# Altium PCB Urukul.PcbDoc (part 8 of 15)
Units mm, origin at the board's own origin, x right, y up, seen from the top; angles counter-clockwise.
Board outline 161.99 x 100 mm, 6 copper layers (L1, L2, L3, L4, P5, L6), stack 1.548 mm thick; 1078 components, 609 nets, 3798 pads, 2552 vias.
Unrouted connection lines stored in the file: 1.
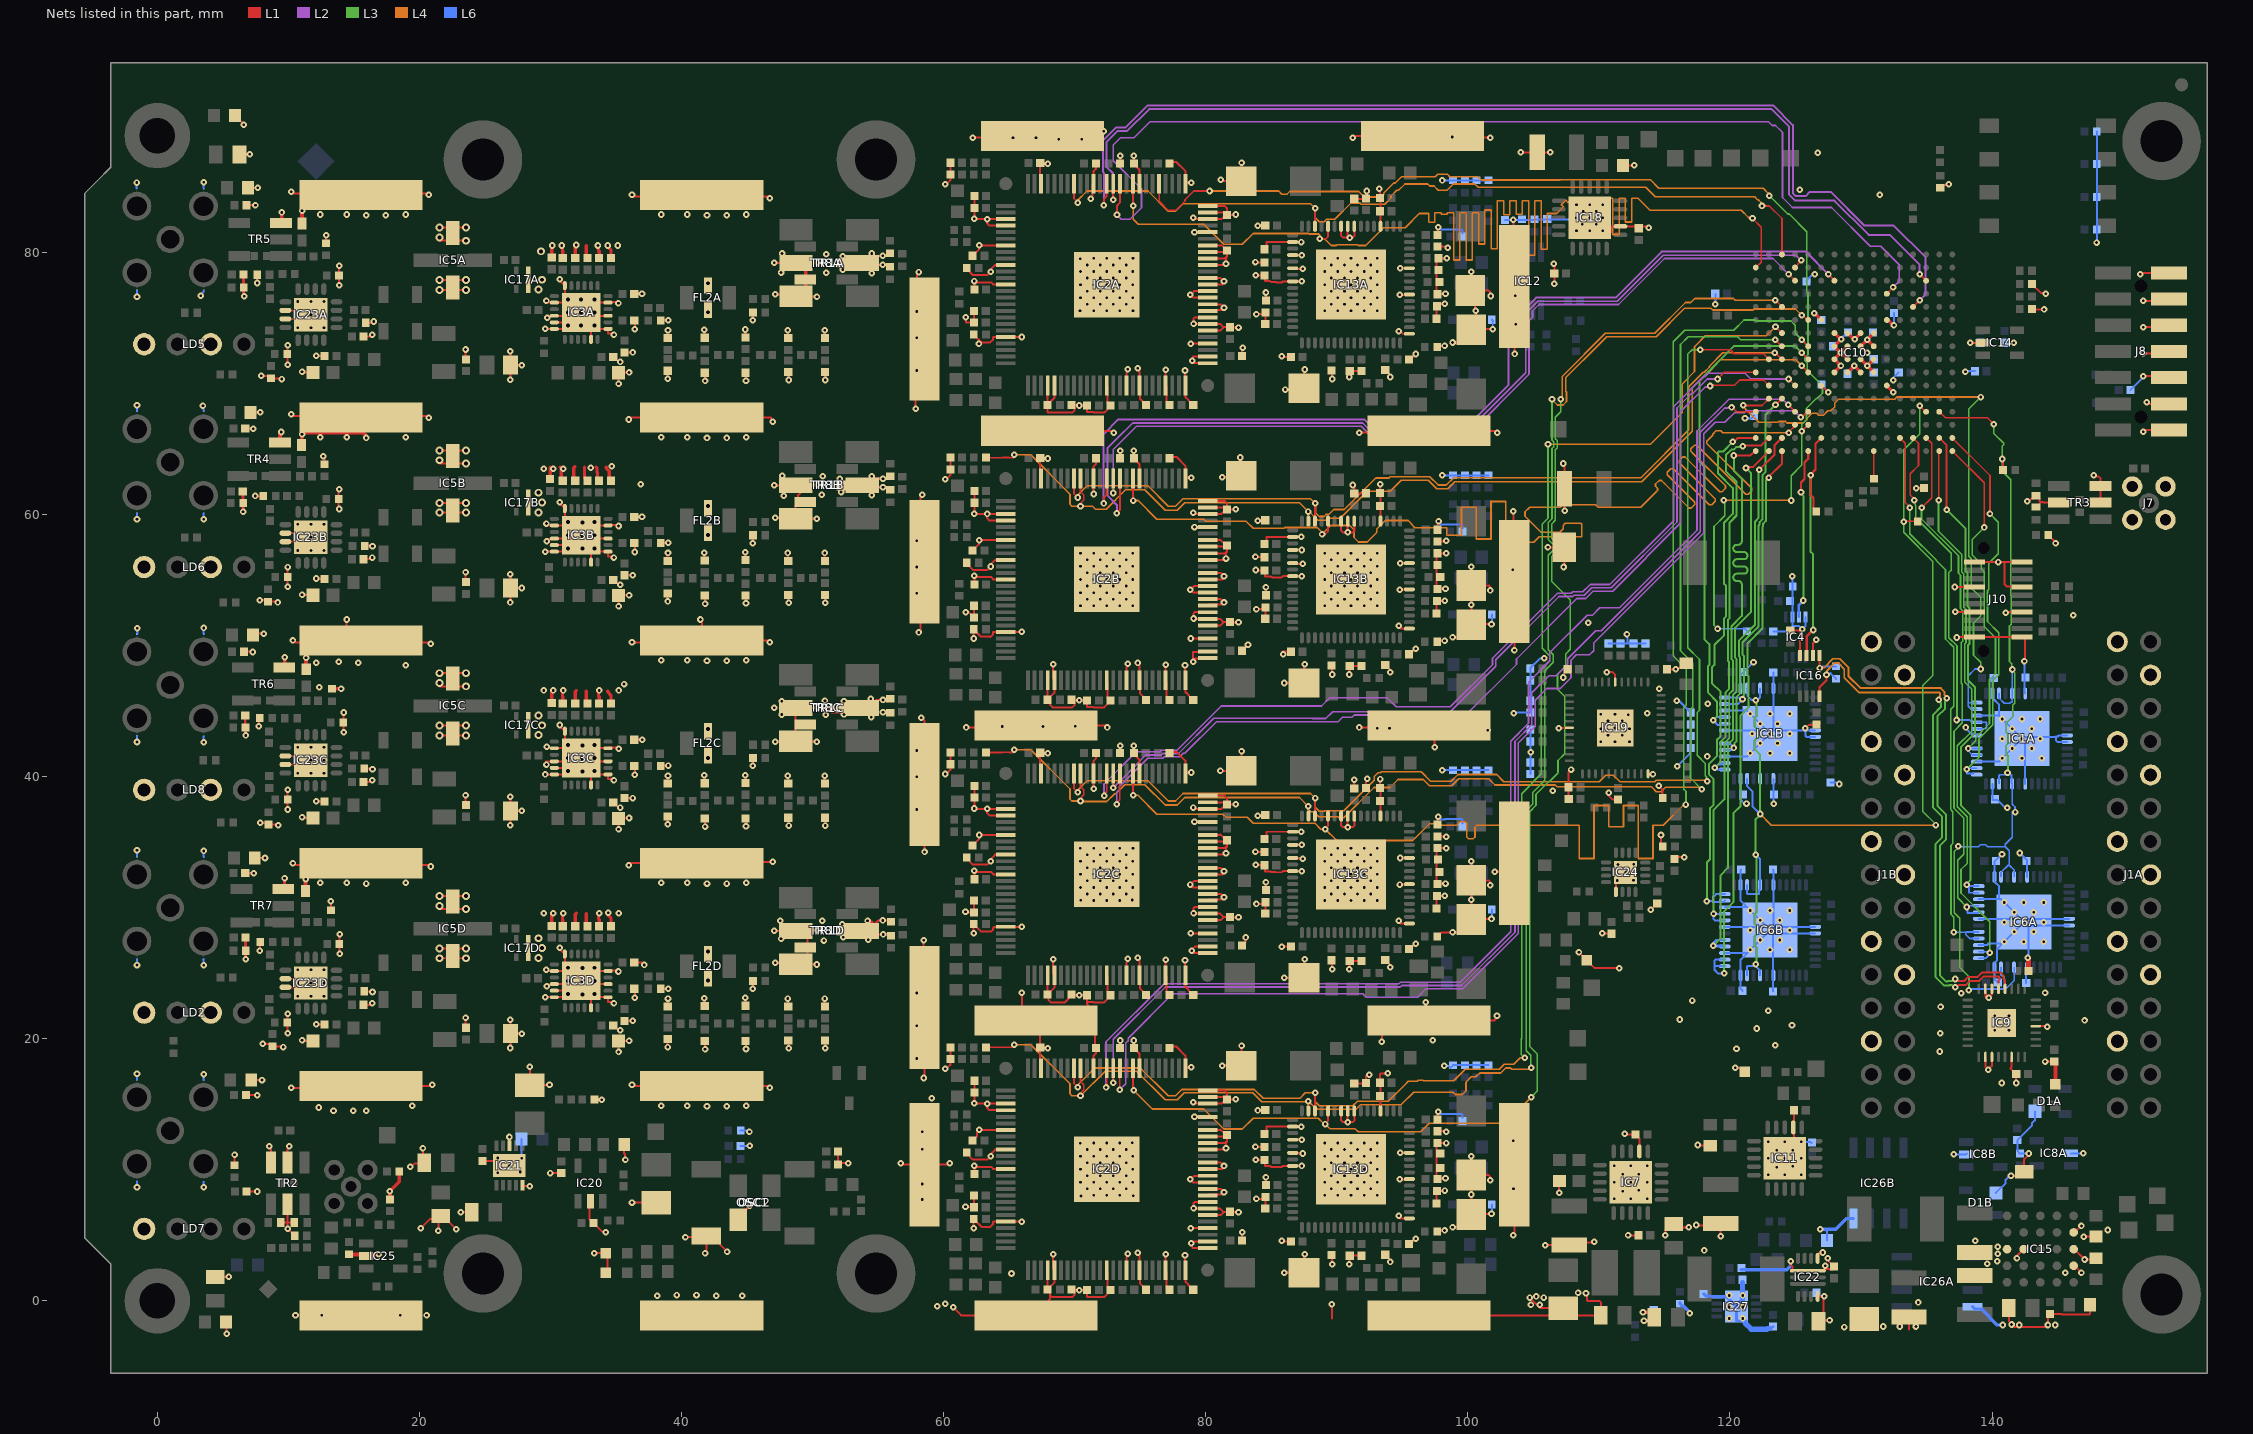
[diagram p10: the nets of this part, all layers, seen from the top]

## Via types
v1: diameter 0.5, hole 0.2, L1 to L6, tented both sides, 1964 vias
v2: diameter 0.5, hole 0.2, L1 to L6, 480 vias
v3: diameter 0.6, hole 0.3, L1 to L6, tented both sides, 52 vias
v4: diameter 0.6, hole 0.3, L1 to L6, 36 vias
v5: diameter 0.762, hole 0.508, L1 to L6, tented both sides, 20 vias

## Nets (pads, with @x,y where several pads share a name; then routed paths per layer and width w, separated by ;. In a path a pad name is that pad's centre, name@x,y a point inside that pad or via, vN(x,y) a via of type N, cw(c..) or ccw(c..) an arc to the next point about the centre after c; other vN are vias at no path point) (continued)
DDS_SDI1: IC2B.67 IC10.K5 IC13B.63 R41B.2 | length 78.1
  L1 w0.127: R41B.2@63.234,64.338 64.485,64.338 64.495,64.348 64.993,64.348 65.003,64.338 65.244,64.338 65.375,64.469 v1(65.375,64.546) ; v1(70.444,60.638) 70.444,60.857 70.691,61.103 70.691,61.489 70.444,61.736 IC2B.67@70.444,62.741 ; IC13B.63@87.834,59.491 v1(87.834,60.223) ; v1(125.47,71.359) 125.47,71.35 125.97,70.85 IC10.K5@125.97,70.841
  L3 w0.127: v1@65.311,64.371 v1@65.344,64.338
  L4 w0.127: v1(65.375,64.546) 66.644,64.546 69.637,61.554 69.637,60.787 69.786,60.638 v1(70.444,60.638) 71.355,60.638 71.593,60.4 72.403,60.4 73.882,61.88 75.352,61.88 76.902,60.331 77.818,60.331 78.392,60.905 87.152,60.905 v1(87.834,60.223) 87.881,60.223 88.536,59.569 89.152,59.569 89.297,59.714 90.263,59.714 92.321,61.772 94.076,61.772 94.913,62.61 96.972,62.61 97.617,61.965 98.465,61.965 99.008,62.508 113.269,62.508 117.12,66.359 117.12,69.646 118.067,70.592 118.134,70.592 118.689,71.148 118.689,71.215 119.273,71.799 125.029,71.799 v1(125.47,71.359)
DDS_SDI2: IC2C.67 IC10.H3 IC13C.63 R41C.2 | length 107.4
  L1 w0.127: R41C.2@63.234,41.838 64.485,41.838 64.495,41.848 64.993,41.848 65.003,41.838 65.244,41.838 65.375,41.969 v1(65.375,42.046) ; v1(70.444,38.138) 70.444,38.357 70.691,38.603 70.691,38.989 70.444,39.236 IC2C.67@70.444,40.241 ; IC13C.63@87.834,36.991 v1(87.834,37.723) ; v1(123.446,73.343) 123.457,73.343 123.959,72.841 IC10.H3@123.97,72.841
  L3 w0.127: v1@65.311,41.871 v1@65.344,41.838 ; v1(117.834,39.041) 116.987,39.888 116.987,45.098 117.172,45.282 117.172,48.664 116.227,49.608 116.227,72.973 116.812,73.558 120.585,73.558 120.801,73.343 v1(123.446,73.343)
  L4 w0.127: v1(65.375,42.046) 66.644,42.046 69.637,39.054 69.637,38.287 69.786,38.138 v1(70.444,38.138) 70.484,38.098 72.445,38.098 73.047,38.7 73.133,38.7 73.813,39.38 75.352,39.38 76.902,37.831 77.818,37.831 78.392,38.405 87.152,38.405 v1(87.834,37.723) 87.834,37.514 88.03,37.317 88.247,37.317 88.634,36.93 90.095,36.93 90.17,36.854 90.525,36.854 92.837,39.166 94.056,39.166 94.67,39.78 96.592,39.78 97.079,39.293 98.78,39.293 99.311,39.824 101.599,39.824 102.069,39.354 106.666,39.354 106.799,39.221 114.012,39.221 114.382,38.85 114.747,38.85 115.086,39.189 117.686,39.189 v1(117.834,39.041)
DDS_SDI3: IC2D.67 IC10.F5 IC13D.63 R41D.2 | length 127.8
  L1 w0.127: R41D.2@63.234,19.338 64.485,19.338 64.495,19.348 64.993,19.348 65.003,19.338 v1@65.244,19.338 ; v1@70.444,15.857 70.691,16.103 70.691,16.489 70.444,16.736 IC2D.67@70.444,17.741 ; IC13D.63@87.834,14.491 v1(87.834,15.223) ; v1(125.47,75.216) v1@125.541,75.144 ; v1@125.573,75.176 125.907,74.841 IC10.F5@125.97,74.841
  L3 w0.127: v1(104.834,17.791) 104.799,17.825 104.799,18.734 104.465,19.068 104.465,37.433 104.944,37.911 104.944,38.791 105.869,39.716 105.869,42.144 105.867,42.146 105.867,48.085 106.511,48.729 106.511,49.309 106.14,49.68 106.14,56.897 106.554,57.311 106.554,57.676 106.14,58.09 106.14,59.384 106.422,59.667 106.422,65.037 106.558,65.173 106.558,65.538 106.422,65.673 v1(106.422,68.779)
  L4 w0.127: v1(65.375,19.546) 66.644,19.546 69.637,16.554 69.637,15.787 69.786,15.638 v1(70.444,15.638) 72.32,17.515 74.718,17.515 76.902,15.331 77.818,15.331 78.355,15.867 83.597,15.867 84.275,15.19 87.801,15.19 v1(87.834,15.223) 88.39,14.667 88.508,14.667 88.556,14.619 91.465,14.619 91.819,14.972 94.926,14.972 95.875,15.922 98.847,15.922 99.031,15.738 99.582,15.738 99.864,16.02 99.864,16.678 100.271,17.085 100.615,17.085 100.917,17.388 102.517,17.388 102.891,17.762 103.277,17.762 103.36,17.679 104.722,17.679 v1(104.834,17.791) ; v1(106.422,68.779) 106.843,68.358 107.264,68.358 107.522,68.617 107.522,69.346 107.47,69.398 107.47,70.451 110.054,73.035 110.589,73.57 114.365,73.57 116.527,75.733 118.558,75.733 118.694,75.597 121.754,75.597 121.841,75.683 125.002,75.683 v1(125.47,75.216)
DDS_SDO0: IC2A.68 IC10.A3 IC13A.62 | length 64.8
  L1 w0.127: IC2A.68@69.944,85.241 69.944,84.107 v1@70.155,83.896 ; v1@70.052,83.796 v1(70.225,83.796) ; IC13A.62@88.334,81.991 88.334,83.353 v1(88.344,83.363) ; v1(122.444,83.541) 123.01,83.541 123.97,82.581 IC10.A3@123.97,79.841
  L4 w0.127: v1(70.225,83.796) 70.225,83.969 70.94,84.684 75.597,84.684 77.146,83.135 77.692,83.135 78.266,83.709 87.998,83.709 v1(88.344,83.363) 88.344,82.655 88.651,82.348 89.037,82.348 89.213,82.524 89.839,82.524 91.084,83.768 91.768,83.768 91.87,83.666 93.648,83.666 94.133,84.151 94.133,84.297 94.569,84.733 94.715,84.733 95.2,85.218 96.942,85.218 97.097,85.064 97.412,85.064 97.732,84.744 98.408,84.744 98.882,85.218 100.534,85.218 100.79,84.962 107.292,84.962 107.306,84.975 112.419,84.975 112.433,84.962 113.578,84.962 114.304,84.235 121.89,84.235 122.102,84.023 122.15,84.023 122.373,83.8 122.373,83.612 v1(122.444,83.541)
DDS_SDO1: IC2B.68 IC10.J3 IC13B.62 | length 66.9
  L1 w0.127: IC2B.68@69.944,62.741 69.944,61.577 v1(70.225,61.296) ; IC13B.62@88.334,59.491 88.334,60.853 v1(88.344,60.863) ; v1(123.422,72.341) 123.446,72.341 123.946,71.841 IC10.J3@123.97,71.841
  L4 w0.127: v1(70.225,61.296) 70.225,61.469 70.94,62.184 75.597,62.184 77.146,60.635 77.692,60.635 78.266,61.209 87.998,61.209 v1(88.344,60.863) 88.378,60.829 88.378,60.12 88.651,59.848 89.037,59.848 89.182,59.993 89.392,59.993 89.775,60.375 90.565,60.375 92.969,62.779 93.978,62.779 94.088,62.889 97.088,62.889 97.732,62.244 98.349,62.244 98.917,62.812 113.214,62.812 116.866,66.464 116.866,69.751 117.961,70.846 118.029,70.846 118.435,71.253 118.435,71.32 119.456,72.341 v1(123.422,72.341)
DDS_SDO2: IC2C.68 IC10.J2 IC13C.62 | length 96
  L1 w0.127: IC2C.68@69.944,40.241 69.944,39.077 v1(70.225,38.796) ; IC13C.62@88.334,36.991 88.334,38.353 v1(88.344,38.363) ; v1(117.741,72.575) 120.019,72.575 120.338,72.256 122.554,72.256 IC10.J2@122.97,71.841
  L3 w0.127: v1(117.741,72.575) 117.119,72.575 116.785,72.242 116.785,49.835 117.68,48.94 117.68,45.072 117.495,44.887 117.495,41.624 118.122,40.997 118.122,40.06 118.208,39.974 118.208,39.71 v1(118.279,39.639)
  L4 w0.127: v1(70.225,38.796) 70.225,38.969 70.94,39.684 75.597,39.684 77.146,38.135 77.692,38.135 78.266,38.709 87.998,38.709 v1(88.344,38.363) 88.344,37.655 88.651,37.348 89.037,37.348 89.077,37.388 90.53,37.388 92.853,39.711 92.853,40.006 93.153,40.305 93.332,40.305 93.386,40.36 96.443,40.36 97.155,39.648 98.741,39.648 99.249,40.156 102.198,40.156 102.746,39.608 110.028,39.608 110.53,40.11 111.106,40.11 111.616,39.6 114.251,39.6 114.382,39.731 118.187,39.731 v1(118.279,39.639)
DDS_SDO3: IC2D.68 IC10.G3 IC13D.62 | length 114
  L1 w0.127: IC2D.68@69.944,17.741 69.944,16.577 v1(70.225,16.296) ; IC13D.62@88.334,14.491 88.334,15.853 v1(88.344,15.863) ; v1@123.476,74.269 123.538,74.269 123.966,73.841 IC10.G3@123.97,73.841
  L3 w0.127: v1(104.334,18.541) 104.084,18.791 104.084,19.983 104.102,20.001 104.102,38.699 105.613,40.209 105.613,48.19 106.257,48.834 106.257,49.203 105.673,49.787 105.673,59.276 106.117,59.721 v1(106.117,65.355)
  L4 w0.127: v1(70.225,16.296) 70.225,16.469 71.524,17.769 75.012,17.769 77.146,15.635 77.692,15.635 78.178,16.121 83.702,16.121 84.38,15.444 87.186,15.444 87.605,15.863 v1(88.344,15.863) 88.344,15.19 88.662,14.873 91.222,14.873 91.575,15.226 93.934,15.226 95.204,16.496 95.462,16.754 96.133,16.754 96.21,16.831 96.575,16.831 96.622,16.784 98.919,16.784 99.798,17.663 102.398,17.663 102.776,18.041 103.492,18.041 103.992,18.541 v1(104.334,18.541) ; v1(106.117,65.355) 113.931,65.355 116.358,67.782 116.358,69.961 117.3,70.904 117.3,72.789 117.782,73.27 117.782,73.3 118.109,73.627 122.777,73.627 v1(123.476,74.327)
DDS_SYNC_CLK0: IC2A.55 IC10.P5 R31.2 | length 95.5
  L1 w0.127: IC2A.55@76.444,85.241 76.444,83.89 77.133,83.202 77.704,83.202 78.416,83.914 78.416,84.003 79.095,84.683 v1(80.289,84.683) ; v1(125.481,66.341) 125.481,66.346 125.97,66.835 IC10.P5@125.97,66.841
  L3 w0.127: v1(119.053,51.277) 118.782,51.548 118.782,59.084 119.599,59.9 v1@119.599,61.09 ; v1(122.994,84.334) 123.009,84.334 124.42,82.923 124.526,82.923 125.866,81.583 125.866,77.015 125.96,76.921 125.96,72.208 125.72,71.968 125.72,71.732 125.91,71.541 125.91,70.967 127.057,69.82 127.057,69.255 126.627,68.825 126.565,68.825 125.842,68.102 125.842,67.233 125.481,66.871 v1(125.481,66.341) 125.481,63.774 124.67,62.963 v1(124.67,61.065)
  L4 w0.127: v1(80.289,84.683) 85.57,84.683 85.811,84.441 86.197,84.441 86.398,84.642 91.683,84.642 92.101,84.224 93.388,84.224 93.575,84.411 93.575,84.528 94.338,85.291 94.455,85.291 94.94,85.776 97.517,85.776 97.694,85.954 98.444,85.954 98.621,85.776 100.765,85.776 101.022,85.52 107.061,85.52 107.074,85.533 113.933,85.533 114.563,84.904 122.546,84.904 122.742,84.708 122.742,84.688 122.994,84.435 v1(122.994,84.334) ; v1(119.515,61.09) 119.528,61.078 124.657,61.078 v1(124.67,61.065)
  L6 w0.127: v1(119.053,51.277) 121.132,51.277 R31.2@121.308,51.102
DDS_SYNC_CLK_OUTEN: IC4.3 IC10.T5 | length 13.1
  L1 w0.178: v1(125.42,61.69) 125.42,62.431 125.686,62.697 125.686,63.977 125.97,64.261 IC10.T5@125.97,64.841
  L3 w0.15: v1(125.42,61.69) 125.42,61.603 125.598,61.425 v1(125.598,53.435)
  L6 w0.178: IC4.3@125.258,52.182 125.258,53.095 v1(125.598,53.435)
DDS_SYNC_CLKSEL: IC10.T10 R152.1 | length 2.1
  L1 w0.127: IC10.T10@130.97,64.841 130.97,62.759 R152.1@130.991,62.738
DDS_SYNC_OUTEN: IC10.R6 IC16.3 R153.1 | length 20.2
  L1 w0.178: IC16.3@125.848,49.235 125.848,50.685 v1(126.348,51.185) ; R153.1@126.578,60.239 126.377,60.44 126.377,61.266 126.147,61.496 126.147,62.983 v1(126.16,62.996) 126.16,63.053 126.529,63.422 126.529,65.4 IC10.R6@126.97,65.841
  L3 w0.15: v1(126.16,62.996) 126.147,62.983 126.147,57.16 126.348,56.959 v1(126.348,51.185)
DDS_UPDATE0: IC2A.59 IC10.B1 IC13A.60 | length 115.6
  L1 w0.127: IC2A.59@74.444,85.241 74.444,83.588 v1(74.469,83.563) ; v1(88.696,81.05) 89.181,81.05 89.334,81.203 IC13A.60@89.334,81.991 ; v1(121.72,82.591) 122.386,81.925 122.386,79.256 IC10.B1@121.97,78.841
  L4 w0.127: v1(74.469,83.563) 74.469,82.516 74.847,82.138 75.119,82.138 79.844,82.138 80.268,81.714 81.369,80.613 82.794,80.613 83.619,81.438 83.959,81.438 86.648,81.438 87.863,81.438 87.895,81.406 88.61,81.406 88.696,81.32 ; v1(88.696,81.05) 89.068,81.05 89.589,80.53 89.953,80.53 90.013,80.589 91.583,80.589 91.644,80.528 92.201,80.528 93.561,81.889 95.213,81.889 96.289,82.964 96.527,82.964 97.004,82.964 97.004,82.3 97.481,82.3 97.481,82.964 97.481,83.028 97.958,83.028 97.958,82.964 97.958,82.901 98.435,82.901 98.435,82.964 98.435,83.028 98.912,83.028 98.912,82.964 98.912,79.423 99.389,79.423 99.389,82.964 99.389,83.028 99.866,83.028 99.866,82.964 99.866,79.423 100.343,79.423 100.343,82.964 100.343,83.028 100.82,83.028 100.82,82.964 100.82,80.645 101.297,80.645 101.297,82.964 101.297,83.232 101.774,83.232 101.774,82.964 101.774,80.275 102.251,80.275 102.251,82.964 102.251,83.949 102.728,83.949 102.728,82.964 102.728,82.871 103.205,82.871 103.205,82.964 103.205,83.949 103.682,83.949 103.682,82.964 103.682,82.901 104.159,82.901 104.159,82.964 104.159,83.949 104.636,83.949 104.636,82.964 104.636,79.79 105.113,79.79 105.113,82.964 105.113,83.949 105.59,83.949 105.59,82.964 105.59,80.238 106.067,80.238 106.067,82.964 106.544,82.964 106.792,82.964 106.961,83.133 107.298,83.47 107.128,83.641 107.465,83.978 107.635,83.807 107.966,84.138 108.205,84.138 108.682,84.138 109.159,84.138 109.636,84.138 110.113,84.138 110.59,84.138 111.067,84.138 111.067,81.363 111.544,81.363 111.544,84.138 112.021,84.138 112.021,82.317 112.498,82.317 112.498,84.138 112.98,84.138 113.901,83.218 120.854,83.218 121.41,82.662 121.649,82.662 v1(121.72,82.591)
DDS_UPDATE1: IC2B.59 IC10.P4 IC13B.60 | length 114.7
  L1 w0.127: IC2B.59@74.444,62.741 74.444,61.088 v1(74.469,61.063) ; v1(88.874,58.495) 89.126,58.495 89.334,58.703 IC13B.60@89.334,59.491 ; v1(124.483,66.236) 124.483,66.295 124.97,66.782 IC10.P4@124.97,66.841
  L4 w0.127: v1(74.469,61.063) 74.844,61.063 76.269,59.638 79.844,59.638 79.994,59.488 83.069,59.488 83.619,58.938 85.977,58.938 86.05,59.011 88.505,59.011 v1@88.945,58.572 ; v1(88.874,58.495) 88.874,58.501 v1@88.945,58.572 ; v1(124.483,66.236) 119.444,66.236 119.3,66.379 118.935,66.379 118.677,66.121 118.677,66.036 118.351,65.71 118.237,65.595 118.237,65.416 121.661,61.992 121.661,61.812 121.391,61.543 121.212,61.543 117.698,65.056 117.468,65.287 117.288,65.287 117.019,65.017 117.019,64.838 117.249,64.607 119.666,62.191 119.666,62.011 119.396,61.742 119.217,61.742 116.8,64.158 116.57,64.389 116.39,64.389 116.121,64.119 116.121,63.94 116.351,63.709 118.881,61.179 118.881,61 118.611,60.73 118.432,60.73 115.902,63.26 115.672,63.491 115.492,63.491 115.223,63.221 115.223,63.042 115.453,62.811 117.319,60.945 117.319,60.766 117.049,60.496 116.87,60.496 115.004,62.362 114.774,62.593 114.594,62.593 114.325,62.323 114.325,62.144 114.465,62.003 114.465,61.824 114.33,61.689 113.202,60.56 109.944,60.56 109.771,60.733 107.216,60.733 107.043,60.56 104.714,60.56 104.367,60.213 104.367,59.868 105.579,58.656 107.016,58.656 107.274,58.914 107.274,59.16 107.435,59.32 107.899,59.32 108.62,59.32 108.694,59.246 108.694,58.291 105.444,58.291 105.027,57.874 104.02,57.874 102.893,57.874 102.893,58.995 102.893,60.994 101.766,60.994 101.766,58.995 101.766,58.123 100.639,58.123 100.639,58.995 100.639,60.545 99.512,60.545 99.512,58.995 99.512,58.426 98.384,58.426 98.384,58.995 97.257,58.995 96.694,58.995 95.956,58.995 95.698,59.253 95.698,59.287 95.444,59.541 93.694,59.541 93.044,58.891 93.044,58.626 92.315,57.898 91.662,57.898 91.31,58.25 91.31,58.831 90.985,59.156 89.528,59.156 v1@88.945,58.572
DDS_UPDATE2: IC2C.59 IC10.H5 IC13C.60 | length 114.2
  L1 w0.127: IC2C.59@74.444,40.241 74.444,38.588 v1(74.469,38.563) ; v1(89.119,35.988) 89.334,36.203 IC13C.60@89.334,36.991 ; v1@125.47,73.342 IC10.H5@125.97,72.842
  L3 w0.127: v1(116.64,37.866) 116.64,38.872 116.479,39.033 116.479,45.308 116.664,45.493 116.664,48.211 115.669,49.205 115.669,73.179 116.557,74.066 120.291,74.066 121.066,74.841 121.97,74.841 122.044,74.767 124.652,74.767 124.988,74.432 124.988,73.825 v1(125.47,73.343)
  L4 w0.127: v1(74.469,38.563) 74.844,38.563 76.269,37.138 81.294,37.138 81.544,36.888 83.169,36.888 83.619,36.438 88.337,36.438 88.787,35.988 v1(89.119,35.988) 89.989,35.119 95.8,35.119 97.078,36.397 97.857,36.397 97.966,36.288 98.952,36.288 99.142,36.288 99.269,36.415 99.269,36.433 99.396,36.56 99.777,36.56 99.904,36.433 99.904,36.288 99.904,35.396 100.031,35.269 100.412,35.269 100.539,35.396 100.539,36.161 100.666,36.288 101.82,36.288 105.444,36.288 108.495,36.288 108.495,33.748 109.622,33.748 109.622,36.288 109.622,37.794 110.749,37.794 110.749,36.288 110.749,36.177 111.876,36.177 111.876,36.288 111.876,37.794 113.004,37.794 113.004,36.288 113.004,33.748 114.131,33.748 114.131,36.288 114.694,36.288 114.913,36.288 116.491,37.866 v1(116.64,37.866)
DDS_UPDATE3: IC2D.59 IC10.E3 IC13D.60 | length 114.3
  L1 w0.127: IC2D.59@74.444,17.741 74.444,16.111 v1(74.492,16.063) ; v1(89.119,13.488) 89.334,13.703 IC13D.60@89.334,14.491 ; v1(123.47,76.341) IC10.E3@123.97,75.841
  L3 w0.127: v1(104.834,15.541) 105.299,16.006 105.299,18.825 104.719,19.406 104.719,37.327 105.198,37.806 105.198,38.645 106.186,39.633 106.254,39.633 106.87,40.249 106.87,40.317 106.875,40.322 106.875,41.221 107.4,41.746 107.4,46.105 106.837,46.667 106.837,47.809 107.459,48.432 107.459,49.357 107.809,49.707 107.809,53.475 106.394,54.891 106.394,56.791 106.808,57.206 106.808,57.781 106.394,58.195 106.394,59.279 106.676,59.561 106.676,64.932 106.812,65.068 106.812,65.643 106.676,65.778 106.676,67.424 107.081,67.829 v1(107.081,68.799)
  L4 w0.127: v1(74.492,16.063) 75.917,14.638 79.844,14.638 81.369,13.113 82.794,13.113 83.619,13.938 88.578,13.938 89.028,13.488 v1(89.119,13.488) 89.476,13.131 91.393,13.131 91.626,12.898 96.403,12.898 97.044,13.538 102.831,13.538 v1(104.834,15.541) ; v1(107.081,68.799) 107.216,68.933 107.216,70.233 107.216,70.556 110.484,73.824 110.671,73.824 114.256,73.824 116.608,76.176 117.008,76.176 117.31,76.478 120.271,76.478 120.408,76.341 v1(123.47,76.341)
DRCTL0: IC2A.62 IC10.C14 | length 78.3
  L1 w0.152: v1(72.937,84.003) 72.937,85.233 IC2A.62@72.944,85.241 ; v1@134.489,78.227 134.584,78.227 IC10.C14@134.97,77.841
  L2 w0.152: v1(72.937,84.003) 72.937,86.019 72.423,86.532 72.423,88.404 73.283,89.264 74.006,89.264 75.677,90.934 123.182,90.934 124.524,89.592 124.524,84.409 124.989,83.944 127.97,83.944 130.579,81.334 132.196,81.334 134.47,79.06 v1(134.47,78.341)
DRCTL1: IC2B.62 IC10.C4 | length 66.4
  L1 w0.127: v1(72.944,61.641) IC2B.62@72.944,62.741 ; v1@124.47,78.31 124.501,78.31 IC10.C4@124.97,77.841
  L2 w0.127: v1(72.944,61.641) 72.944,64.961 74.712,66.729 91.865,66.729 92.503,66.092 100.057,66.092 104.667,70.702 104.667,74.785 104.938,75.056 104.938,75.53 105.429,76.02 111.493,76.02 115.004,79.531 123.28,79.531 v1(124.47,78.341)
DRCTL2: IC2C.62 IC10.K1 | length 68.7
  L1 w0.127: IC2C.62@72.944,40.241 72.944,39.147 v1(72.951,39.141) ; v1(119.053,70.338) 119.556,70.841 IC10.K1@121.97,70.841
  L2 w0.127: v1(72.951,39.141) 74.194,40.384 74.194,40.413 75.432,41.651 76.614,41.651 76.72,41.757 77.919,41.757 80.605,44.443 88.129,44.443 88.137,44.436 89.165,44.436 89.68,44.951 98.659,44.951 102.13,48.422 102.13,48.924 106.949,53.743 108.003,53.743 108.099,53.839 108.883,53.839 109.445,54.401 110.941,54.401 115.964,59.424 115.964,68.13 117.032,69.199 117.135,69.199 118.274,70.338 v1(119.053,70.338)
DRCTL3: IC2D.62 IC10.N1 | length 88.2
  L1 w0.127: v1(72.944,16.641) IC2D.62@72.944,17.741 ; v1(120.12,68.166) 120.196,68.166 120.521,67.841 IC10.N1@121.97,67.841
  L2 w0.127: v1(72.944,16.641) 72.944,19.961 76.93,23.947 94.854,23.947 94.961,24.054 99.514,24.054 103.594,28.134 103.594,42.673 104.878,43.956 104.878,46.396 106.186,47.705 106.732,47.705 107.623,48.595 107.623,48.991 109.75,51.118 110.172,51.118 117.742,58.688 117.742,66.264 119.606,68.128 120.083,68.128 v1(120.12,68.166)
DRHOLD0: IC2A.63 IC10.E13 | length 82.8
  L1 w0.152: v1(72.22,83.591) 72.22,84.067 72.444,84.291 IC2A.63@72.444,85.241 ; IC10.E13@133.97,75.841 134.376,76.247 v1@134.376,76.341
  L2 w0.152: v1(72.22,83.591) 72.22,86.064 72.144,86.14 72.144,88.52 73.168,89.543 73.891,89.543 75.561,91.213 123.297,91.213 124.803,89.708 124.803,84.524 125.041,84.286 125.775,84.286 126.099,84.61 127.698,84.61 130.267,82.041 132.495,82.041 134.923,79.613 134.923,76.794 v1(134.47,76.341)
DRHOLD1: IC2B.63 IC10.C7 | length 73.5
  L1 w0.152: v1(72.22,60.841) 72.22,61.298 72.444,61.521 IC2B.63@72.444,62.741 ; v1(127.515,78.341) 127.515,78.318 127.97,77.863 IC10.C7@127.97,77.841
  L2 w0.152: v1(72.22,60.841) 72.212,60.849 72.212,66.129 73.333,67.25 92.081,67.25 92.718,66.612 99.842,66.612 103.115,69.886 103.115,75.329 103.767,75.981 104.653,75.981 105.213,76.541 111.278,76.541 114.789,80.052 125.804,80.052 v1(127.515,78.341)
DRHOLD2: IC2C.63 IC10.L4 | length 74.9
  L1 w0.127: v1(72.242,38.539) 72.242,38.637 72.444,38.839 IC2C.63@72.444,40.241 ; v1@124.469,70.237 v1(124.469,70.338) 124.471,70.338 IC10.L4@124.97,69.841 IC10.L4@124.97,69.841
  L2 w0.127: v1(72.242,38.539) 72.242,39.438 74.709,41.905 76.509,41.905 76.615,42.011 77.813,42.011 81.194,45.391 88.834,45.391 89.467,46.025 93.833,46.025 94.541,45.317 98.666,45.317 101.876,48.527 101.876,49.029 106.844,53.997 107.898,53.997 107.994,54.093 108.777,54.093 109.34,54.655 110.836,54.655 115.71,59.53 115.71,68.236 117.972,70.498 118.075,70.498 118.355,70.779 121.142,70.779 121.582,70.338 v1(124.469,70.338)
DRHOLD3: IC2D.63 IC10.N4 | length 93.4
  L1 w0.127: v1@72.444,16.324 IC2D.63@72.444,17.741 ; v1(124.453,68.372) 124.453,68.365 124.97,67.848 IC10.N4@124.97,67.841
  L2 w0.127: v1(72.392,16.28) 72.392,19.769 76.825,24.201 94.749,24.201 94.856,24.308 99.409,24.308 103.267,28.166 103.267,42.705 104.624,44.062 104.624,47.206 106.257,48.839 106.257,49.47 109.102,52.315 109.514,52.315 110.076,52.877 111.572,52.877 117.488,58.793 117.488,66.369 119.922,68.804 124.021,68.804 v1(124.453,68.372)
DROVER0: IC2A.61 IC10.D11 | length 81.3
  L1 w0.127: IC10.D11@131.97,76.841 131.97,76.852 132.44,77.322 v1@132.44,77.337
  L1 w0.152: v1(73.229,82.863) 73.229,83.572 73.444,83.788 IC2A.61@73.444,85.241
  L2 w0.127: v1(73.229,82.863) 73.561,82.53 74.227,82.53 75.094,83.398 75.094,84.838 72.944,86.988 72.944,88.188 73.499,88.743 74.527,88.743 75.75,89.966 122.944,89.966 123.228,89.682 123.476,89.682 124.003,89.154 124.003,84.193 124.773,83.423 127.754,83.423 130.714,80.463 131.512,80.463 132.915,79.06 132.915,77.808 v1(132.444,77.337)
DROVER1: IC2B.61 IC10.B4 | length 71
  L1 w0.127: IC10.B4@124.97,78.841 124.97,78.887 125.327,79.243 v1@125.359,79.243
  L1 w0.152: v1(73.22,60.091) 73.22,60.13 73.444,60.354 IC2B.61@73.444,62.741
  L2 w0.127: 73.256,65.817 74.422,66.983 91.97,66.983 92.608,66.346 99.952,66.346 104.413,70.807 104.413,75.364 105.324,76.274 111.388,76.274 114.899,79.785 125.029,79.785 v1(125.426,79.388)
  L2 w0.152: v1(73.22,60.091) 73.22,60.724 72.491,61.453 72.491,65.052 73.256,65.817
DROVER2: IC2C.61 IC10.L2 | length 71.7
  L1 w0.127: v1(73.217,37.889) 73.217,37.99 73.347,38.119 73.347,38.128 73.444,38.226 IC2C.61@73.444,40.241 ; v1(118.48,69.803) 118.55,69.874 120.368,69.874 120.75,70.256 122.554,70.256 IC10.L2@122.97,69.841
  L2 w0.127: v1(73.217,37.889) 73.217,38.784 73.391,38.958 73.391,39.222 75.566,41.397 76.719,41.397 76.826,41.503 78.024,41.503 78.291,41.77 78.407,41.77 80.827,44.189 88.024,44.189 88.031,44.182 90.088,44.182 90.431,44.525 91.158,44.525 91.33,44.697 99.849,44.697 103.711,48.559 103.711,48.976 108.32,53.585 108.988,53.585 109.55,54.147 111.046,54.147 116.218,59.319 116.218,67.834 118.116,69.732 118.409,69.732 v1(118.48,69.803)
DROVER3: IC2D.61 IC10.N5 | length 93.6
  L1 w0.127: IC2D.61@73.444,17.741 v1(73.444,16.117) v1@73.444,16.053 ; v1(125.402,67.415) 125.473,67.415 125.899,67.841 IC10.N5@125.97,67.841 ; v1@73.444,16.053 73.444,15.996 73.415,16.025 v1@73.444,16.053
  L2 w0.127: v1(73.444,16.117) 73.9,16.573 73.9,19.671 74.079,19.85 74.079,20.046 77.466,23.433 91.982,23.433 92.242,23.173 96.179,23.173 96.806,23.8 99.619,23.8 103.848,28.028 103.848,42.568 105.132,43.851 105.132,45.82 106.03,46.719 107.057,46.719 107.877,47.539 107.877,48.886 108.276,49.285 109.278,49.285 109.6,49.607 109.6,50.187 117.996,58.583 117.996,66.159 118.872,67.035 119.612,67.035 120.36,67.783 121.113,67.783 121.24,67.91 124.907,67.91 v1(125.402,67.415)
EEM0_0: IC1A.35 IC1A.36 IC10.M2 | length 49
  L1 w0.127: v1(121.028,68.321) 122.45,68.321 IC10.M2@122.97,68.841
  L3 w0.127: v1(139.136,48.208) 139.136,48.712 138.585,49.263 138.585,51.708 139.136,52.259 139.136,53.661 138.404,54.394 138.404,56.629 138.223,56.809 138.223,68.047 v1(139.136,68.96)
  L4 w0.127: v1(121.028,68.321) 121.028,68.22 121.156,68.092 121.156,68.08 122.206,67.029 123.657,67.029 123.718,67.091 124.238,67.091 124.354,66.975 125.584,66.975 125.849,67.239 125.849,67.318 126.262,67.731 126.627,67.731 126.777,67.582 127.133,67.582 127.463,67.913 127.698,67.913 127.993,68.208 127.993,68.509 128.288,68.804 132.563,68.804 132.719,68.96 v1(139.136,68.96)
  L6 w0.127: 138.169,45.646 IC1A.36@138.831,45.646 ; IC1A.35@138.831,45.146 138.406,45.146 138.191,45.361 138.191,47.703 138.695,48.208 v1(139.136,48.208)
EEM0_1: IC1A.32 IC1A.33 IC10.R13 | length 26.7
  L1 w0.127: IC10.R13@133.97,65.841 134.385,65.425 134.385,63.737 133.764,63.115 133.764,61.492 134.064,61.191 v1(134.064,61.09)
  L3 w0.127: v1(134.064,61.09) 134.136,61.019 134.136,60.723 134.18,60.679 134.18,59.742 136.889,57.032 136.889,55.749 136.707,55.566 136.707,50.597 137.323,49.981 137.323,44.35 v1(137.29,44.318)
  L6 w0.127: v1(137.29,44.318) 138.286,44.318 IC1A.33@138.423,44.18 ; IC1A.32@138.831,43.646 139.494,43.646 139.571,43.723 139.571,44.123 139.549,44.146 IC1A.33@138.831,44.146
EEM0_2: IC1A.28 IC1A.29 IC10.T16 | length 28.1
  L1 w0.127: IC10.T16@136.97,64.841 139.398,62.412 v1(139.398,59.01)
  L3 w0.127: v1(138.169,42.146) 138.748,42.725 138.748,42.988 139.808,44.048 139.808,47.415 140.262,47.869 140.262,50.588 139.398,51.452 139.398,55.615 139.171,55.842 139.171,56.22 138.477,56.915 138.477,58.088 v1(139.398,59.01)
  L6 w0.127: IC1A.28@139.169,41.646 IC1A.28@138.831,41.646 138.499,41.646 138.195,41.95 138.169,41.923 v1(138.169,42.146) IC1A.29@138.831,42.146 IC1A.29@139.224,42.146
EEM0_3: IC1A.25 IC1A.26 IC10.R16 | length 30.1
  L1 w0.127: IC10.R16@136.97,65.841 139.839,62.972 v1(139.839,60.047)
  L3 w0.127: v1(138.071,40.548) 139.002,41.479 139.002,42.883 140.062,43.943 140.062,47.309 140.516,47.764 140.516,49.111 140.518,49.112 140.518,50.973 139.652,51.838 139.652,54.187 139.754,54.288 139.754,56.278 140.473,56.998 140.473,59.413 v1(139.839,60.047)
  L6 w0.127: IC1A.25@138.611,40.231 138.071,40.231 v1(138.071,40.548) 138.169,40.646 IC1A.26@138.831,40.646
EEM0_4: IC6A.35 IC6A.36 IC10.R15 | length 38.3
  L1 w0.152: IC10.R15@135.97,65.841 136.542,65.269 136.542,60.361 v1(136.546,60.357)
  L3 w0.152: v1(136.546,60.357) 137.956,58.947 137.956,55.725 138.108,55.573 138.108,53.029 138.277,52.86 138.277,50.12 138.178,50.022 138.178,47.333 138.712,46.8 138.712,43.329 137.618,42.236 137.618,37.806 138.368,37.057 138.368,32.133 138.071,31.837 v1(138.071,31.743)
  L6 w0.127: IC6A.35@138.981,31.146 138.242,31.146 138.242,31.573 138.169,31.646 IC6A.36@138.981,31.646
EEM0_5: IC6A.32 IC6A.33 IC10.R14 | length 41
  L1 w0.127: v1(134.62,60.515) 135.386,61.28 135.386,65.425 IC10.R14@134.97,65.841
  L3 w0.127: v1(134.62,60.515) 134.62,59.661 137.435,56.845 137.435,55.51 137.588,55.357 137.588,52.813 137.756,52.645 137.756,50.336 137.658,50.237 137.658,47.117 137.731,47.044 137.731,44.099 137.098,43.465 137.098,37.591 137.847,36.841 137.847,34.078 137.377,33.608 137.377,30.743 v1(138.071,30.048)
  L6 w0.127: IC6A.32@138.981,29.646 138.923,29.587 138.131,29.587 138.131,29.989 v1(138.071,30.048) 138.169,30.146 IC6A.33@138.981,30.146
EEM0_6: IC6A.28 IC6A.29 IC10.R12 | length 42.9
  L1 w0.127: IC10.R12@132.97,65.841 133.386,65.425 133.386,60.907 133.72,60.573 v1(133.72,60.516)
  L3 w0.127: v1(133.72,60.516) 133.72,58.533 135.732,56.521 135.732,56.495 136.453,55.774 136.453,50.492 137.069,49.876 137.069,45.363 136.844,45.138 136.844,37.485 137.005,37.324 137.005,34.892 136.869,34.756 136.869,29.496 137.087,29.278 v1(137.087,28.112)
  L6 w0.127: v1(137.087,28.112) 137.998,28.112 ; IC6A.28@138.981,27.646 138.298,27.646 137.998,27.945 137.998,28.112 ; IC6A.29@138.981,28.146 138.032,28.146 137.998,28.112
EEM0_7: IC6A.25 IC6A.26 IC10.T15 | length 43.3
  L1 w0.127: v1(135.919,61.09) 135.944,61.116 135.944,64.815 IC10.T15@135.97,64.841
  L3 w0.127: v1(135.919,61.09) 135.919,58.721 137.689,56.951 137.689,55.615 137.842,55.463 137.842,52.918 138.01,52.75 138.01,50.231 137.912,50.132 137.912,47.223 138.445,46.689 138.445,43.44 137.352,42.346 137.352,37.696 138.101,36.946 138.101,33.375 137.631,32.905 137.631,31.112 139.821,28.921 v1(139.821,26.548)
  L6 w0.127: IC6A.25@138.981,26.146 139.516,26.146 139.821,26.451 v1(139.821,26.548) 139.724,26.646 IC6A.26@138.981,26.646
EEM1_0: IC1B.35 IC1B.36 IC10.M3 | length 27.2
  L1 w0.152: v1(123.476,68.363) 123.484,68.363 123.962,68.841 IC10.M3@123.97,68.841
  L3 w0.152: v1(120.958,45.892) 121.025,45.959 121.025,46.205 121.054,46.234 121.054,49.208 120.958,49.303 120.958,50.246 122.19,51.478 122.19,59.141 122.257,59.208 122.257,59.412 122.468,59.622 122.468,62.993 122.703,63.227 122.703,67.59 v1(123.476,68.363)
  L6 w0.127: IC1B.36@119.608,46.032 120.818,46.032 v1(120.958,45.892)
  L6 w0.152: IC1B.35@119.608,45.532 120.598,45.532 v1(120.958,45.892)
EEM1_1: IC1B.32 IC1B.33 IC10.J5 | length 38.5
  L1 w0.152: v1(125.47,72.341) IC10.J5@125.97,71.841
  L3 w0.152: v1(118.723,44.286) 119.002,44.565 119.002,45.732 118.334,46.399 118.334,48.441 118.423,48.53 118.423,50.102 118.041,50.484 118.041,63.658 117.685,64.014 117.685,70.222 120.305,72.841 124.97,72.841 v1(125.47,72.341)
  L6 w0.152: IC1B.32@119.608,44.032 119.51,43.935 119.074,43.935 v1(118.723,44.286) 118.969,44.532 IC1B.33@119.608,44.532
EEM1_2: IC1B.28 IC1B.29 IC10.R3 | length 26.9
  L1 w0.152: v1(122.249,63.415) 123.398,64.564 123.398,65.269 IC10.R3@123.97,65.841
  L3 w0.152: v1(120.298,42.184) 120.364,42.251 120.364,42.567 120.505,42.708 120.505,46.08 120.774,46.349 120.774,49.092 120.679,49.187 120.679,50.362 121.911,51.594 121.911,59.46 122.189,59.738 122.189,63.354 v1(122.249,63.415)
  L6 w0.152: IC1B.28@119.608,42.032 120.146,42.032 v1(120.298,42.184) 120.298,42.235 120,42.532 IC1B.29@119.608,42.532
EEM1_3: IC1B.25 IC1B.26 IC10.R2 | length 31.1
  L1 w0.152: v1(120.97,65.209) 121.03,65.269 122.398,65.269 IC10.R2@122.97,65.841
  L3 w0.152: v1(118.848,40.685) 119.286,41.122 119.286,42.674 119.667,43.055 119.667,46.427 119.936,46.697 119.936,48.745 119.84,48.84 119.84,51.961 119.969,52.089 119.969,55.141 119.969,58.941 119.969,59.39 120.501,59.922 120.501,62.48 119.69,63.292 119.69,64.538 120.103,64.952 120.274,64.952 120.464,65.142 120.903,65.142 v1(120.97,65.209)
  L6 w0.152: 119.098,40.935 119.153,40.935 ; IC1B.25@119.608,40.532 118.945,40.532 118.848,40.63 119.153,40.935 ; 119.153,40.935 119.51,40.935 IC1B.26@119.608,41.032 119.25,41.032 119.153,40.935
EEM1_4: IC6B.35 IC6B.36 IC10.R1 | length 42.6
  L1 w0.152: v1(120.222,65.541) 120.316,65.541 120.616,65.841 IC10.R1@121.97,65.841
  L3 w0.152: v1(118.24,30.5) 118.24,33.447 118.475,33.682 118.475,37.572 118.732,37.829 118.732,39.827 118.395,40.164 118.395,40.954 119.006,41.566 119.006,42.79 119.282,43.065 119.282,46.457 118.614,47.125 118.614,48.326 118.808,48.52 118.808,50.042 119.561,50.795 119.561,52.076 119.69,52.205 119.69,54.58 119.561,54.709 119.561,59.386 120.222,60.047 120.222,62.018 119.075,63.165 119.075,64.718 119.164,64.808 119.489,64.808 v1(120.222,65.541)
  L6 w0.152: v1(118.24,30.5) 118.642,30.5 118.708,30.435 ; IC6B.35@119.608,30.532 119.51,30.435 118.708,30.435 ; IC6B.36@119.608,31.032 118.945,31.032 118.708,30.794 118.708,30.435
EEM1_5: IC6B.32 IC6B.33 IC10.T1 | length 44.4
  L1 w0.152: v1(120.291,64.499) 121.547,64.499 121.889,64.841 IC10.T1@121.97,64.841
  L3 w0.152: v1(118.748,29.535) 118.755,29.541 118.755,37.456 119.565,38.267 119.565,42.558 119.946,42.939 119.946,46.312 120.215,46.581 120.215,48.86 120.12,48.956 120.12,51.48 120.907,52.267 120.907,54.575 120.907,54.651 ccw(c120.631,54.651) 120.631,54.927 120.525,54.927 cw(c120.525,55.203) 120.525,55.48 121.059,55.48 ccw(c121.059,55.756) 121.059,56.032 120.525,56.032 cw(c120.525,56.308) 120.525,56.584 121.059,56.584 ccw(c121.059,56.861) 121.059,57.137 120.525,57.137 cw(c120.525,57.413) 120.525,57.689 120.631,57.689 ccw(c120.631,57.965) 120.907,57.965 120.907,58.559 120.907,62.734 120.291,63.351 v1(120.291,64.499)
  L6 w0.152: v1(118.748,29.535) v1@118.748,29.532 ; IC6B.32@119.608,29.032 118.844,29.032 118.748,29.128 v1@118.748,29.532 ; IC6B.33@119.608,29.532 v1@118.748,29.532
EEM1_6: IC6B.28 IC6B.29 IC10.T2 | length 43
  L1 w0.152: v1(121.224,63.548) 121.29,63.614 121.743,63.614 IC10.T2@122.97,64.841
  L3 w0.152: v1(118.723,27.096) 119.282,27.655 119.282,32.465 119.844,33.028 119.844,42.442 120.225,42.823 120.225,46.196 120.495,46.465 120.495,48.976 120.399,49.072 120.399,51.364 121.614,52.58 121.614,63.157 v1(121.224,63.548)
  L6 w0.152: v1@118.708,27.032 IC6B.28@119.608,27.032 119.543,27.096 v1(118.723,27.096) ; v1@118.708,27.282 118.958,27.532 IC6B.29@119.608,27.532
EEM1_7: IC6B.25 IC6B.26 IC10.T3 | length 44.9
  L1 w0.152: v1(122.958,62.811) 122.958,62.874 123.97,63.886 IC10.T3@123.97,64.841
  L3 w0.152: v1(119.561,24.988) 119.561,29.72 120.283,30.442 120.283,37.229 120.81,37.756 120.81,44.675 121.411,45.276 121.411,47.692 121.343,47.76 121.343,50.175 122.47,51.302 122.47,59.026 122.537,59.093 122.537,59.296 122.748,59.507 122.748,62.601 v1(122.958,62.811)
  L6 w0.152: v1(119.561,24.988) 119.078,24.988 118.824,25.242 118.824,25.532 ; IC6B.25@119.608,25.532 118.824,25.532 ; IC6B.26@119.608,26.032 118.882,26.032 118.824,25.974 118.824,25.532
FB_SYNC_N: IC9.20 IC16.1 R114.2 | length 42.6
  L1 w0.152: v1(126.848,48.282) IC16.1@126.848,49.235 ; v1(137.18,24.556) 137.274,24.556 137.436,24.394 137.858,24.394 138.175,24.71 138.898,24.71 139.246,25.059 140.619,25.059 140.885,24.792 140.885,24.57 140.975,24.481 140.991,24.481 IC9.20@140.991,23.805
  L3 w0.15: v1(136.546,45.978) 136.546,45.884 136.423,45.761 136.423,45.19 135.82,44.587 135.82,37.762 136.488,37.094 136.488,35.204 136.019,34.736 136.019,24.838 136.484,24.373 136.608,24.373 136.637,24.403 136.931,24.403 137.085,24.556 v1(137.18,24.556)
  L4 w0.15: v1(126.848,48.282) 126.886,48.321 127.181,48.321 127.851,48.991 128.391,48.991 129.042,48.34 129.042,47.674 129.972,46.744 133.743,46.744 133.748,46.75 136.086,46.75 136.361,46.475 136.361,46.241 136.546,46.057 v1(136.546,45.978)
  L6 w0.152: v1(126.848,48.282) 127.002,48.282 127.124,48.405 R114.2@128.098,48.405
FB_SYNC_P: IC9.21 IC16.8 R114.1 | length 42.4
  L1 w0.152: IC16.8@126.848,46.135 126.848,46.836 127.368,47.356 v1(127.368,47.762) ; v1(137.18,23.929) 137.274,23.929 137.436,24.092 137.983,24.092 138.3,24.408 139.023,24.408 139.371,24.756 140.494,24.756 140.583,24.667 140.583,24.541 140.491,24.449 IC9.21@140.491,23.805
  L3 w0.15: v1(135.919,45.867) 135.919,45.789 136.103,45.604 136.103,45.322 135.5,44.719 135.5,37.629 136.168,36.962 136.168,35.337 135.699,34.868 135.699,24.706 136.351,24.054 136.741,24.054 136.77,24.083 136.931,24.083 137.085,23.929 v1(137.18,23.929)
  L4 w0.15: v1(127.368,47.762) 127.407,47.8 127.407,48.095 127.983,48.671 128.259,48.671 128.722,48.208 128.722,47.541 129.839,46.424 133.875,46.424 133.881,46.43 135.953,46.43 136.041,46.342 136.041,46.084 135.919,45.962 v1(135.919,45.867)
  L6 w0.152: v1(127.368,47.762) 127.532,47.762 127.666,47.896 R114.1@128.098,47.465
FSEN_EM0: IC1A.20 IC1A.22 IC1A.39 IC1A.41 IC6A.20 IC6A.22 IC6A.39 IC6A.41 IC10.N15 R175.2 | length 70.7
  L1 w0.127: IC10.N15@135.97,67.841 136.442,67.369 139.65,67.369 v1(140.131,66.888) ; v1(140.769,64.234) 140.831,64.172 R175.2@140.831,63.408
  L3 w0.127: v1(137.406,34.671) 137.406,34.57 137.123,34.286 137.123,29.601 137.527,29.197 137.527,25.431 138.235,24.724 v1(138.235,23.703) ; v1(140.131,66.888) 140.131,66.184 140.883,65.432 140.883,65.327 140.786,65.23 140.786,65.058 140.781,65.053 140.781,64.234 140.781,63.292 141.418,62.656 141.418,53.831 141.472,53.777 141.472,51.63 141.336,51.494 141.336,48.788 141.503,48.621 141.503,48.123 141.726,47.9 141.726,45.604 141.587,45.465 141.587,44.578 141.091,44.082 141.091,43.376 141.222,43.245 141.222,42.539 141.091,42.408 141.091,41.709 141.222,41.578 141.222,40.324 v1(141.176,40.279)
  L6 w0.127: v1(137.406,34.671) 137.431,34.646 138.948,34.646 139.114,34.811 139.499,34.811 139.665,34.646 141.006,34.646 ; v1(138.235,23.703) 138.328,23.795 140.82,23.795 140.932,23.907 140.932,23.909 ; IC1A.22@140.531,39.446 140.531,40.108 140.569,40.146 141.481,40.146 141.481,39.496 IC1A.20@141.531,39.446 141.531,38.747 141.537,38.741 141.537,37.899 141.755,37.68 v1(141.755,37.296) 141.573,37.296 141.531,37.338 141.531,35.361 141.006,34.836 141.006,34.646 ; IC1A.39@140.531,46.346 140.531,45.996 140.936,45.592 141.34,45.592 141.432,45.683 141.531,45.683 IC1A.41@141.531,46.346 141.531,48.126 141.521,48.137 v1(141.555,48.171) ; IC6A.22@140.681,25.446 140.681,24.844 140.729,24.796 140.82,24.796 140.932,24.685 140.932,23.909 ; IC6A.39@140.681,32.346 140.681,32.696 141.231,33.246 141.306,33.246 ; IC6A.20@141.681,25.446 141.681,24.442 141.149,23.909 140.932,23.909 ; IC6A.41@141.681,32.346 141.681,32.871 141.306,33.246 ; 141.006,34.646 141.306,34.346 141.306,33.246
FSEN_EM1: IC1B.20 IC1B.22 IC1B.39 IC1B.41 IC6B.20 IC6B.22 IC6B.39 IC6B.41 IC10.N14 R1.2 | length 86
  L1 w0.127: v1(133.258,59.436) 133.298,59.477 R1.2@134.334,59.477 R1.2@134.321,59.489 ; v1(134.47,68.298) 134.927,67.841 IC10.N14@134.97,67.841
  L3 w0.127: v1(134.47,68.298) 134.47,66.145 133.258,64.932 v1(133.258,59.436) 133.258,58.636 135.478,56.416 135.478,47.713 134.719,46.954 134.719,37.338 135.716,36.341 v1(135.716,36.302)
  L3 w0.152: v1(121.958,25.684) 122.011,25.737 122.011,26.97 121.855,27.126 121.855,27.788 122.011,27.944 122.011,28.606 121.855,28.762 121.855,29.438 122.011,29.594 122.011,33.979 v1(121.958,34.032) 121.958,36.751 122.308,37.101 122.308,41.673 121.855,42.126 121.855,42.72 122.161,43.026 122.161,43.538 121.855,43.844 121.855,44.438 122.011,44.594 122.011,45.784 v1(121.968,45.827)
  L4 w0.127: v1(122.308,37.145) 123.161,36.291 135.705,36.291 v1(135.716,36.302)
  L6 w0.152: IC6B.22@121.308,24.832 121.308,25.494 121.345,25.532 121.958,25.532 122.308,25.182 IC6B.20@122.308,24.832 ; IC6B.39@121.308,31.732 121.308,31.07 121.345,31.032 122.208,31.032 122.208,31.282 122.308,31.382 IC6B.41@122.308,31.732 122.308,33.682 v1(121.958,34.032) ; IC1B.22@121.308,39.832 121.308,39.274 121.716,38.866 121.716,37.736 v1(122.308,37.145) IC1B.20@122.308,39.832 ; IC1B.39@121.308,46.732 121.333,46.707 121.333,46.158 121.664,45.827 v1(121.968,45.827) 122.034,45.893 122.164,45.893 122.308,46.037 IC1B.41@122.308,46.732
GND: C1.1 C2A.1 C2B.1 C3A.1 C3B.1 C4A.1 C4B.1 C5A.1 C5B.1 C6A.1 C6B.1 C7A.1 C7B.1 C8A.1 C8B.1 C9A.1 C9B.1 C10A.1 C10B.1 C11.2 C12A.1 C12B.1 C12C.1 C12D.1 C13.1 C14A.1 C14B.1 C14C.1 C14D.1 C15A.1 C15B.1 C15C.1 C15D.1 C16A.1 C16B.1 C16C.1 C16D.1 C17A.1 C17B.1 C17C.1 C17D.1 C18A.1 C18B.1 C18C.1 C18D.1 C19A.1 C19B.1 C19C.1 C19D.1 C20A.1 C20B.1 C20C.1 C20D.1 C21A.1 C21B.1 C21C.1 C21D.1 C22A.1 C22B.1 C22C.1 C22D.1 C23A.1 C23B.1 C23C.1 C23D.1 C24A.1 C24B.1 C24C.1 C24D.1 C25.1 C26A.1 C26B.1 C26C.1 C26D.1 C27A.1 C27B.1 C27C.1 C27D.1 C31.2 C32.1 C33.2 C34.1 C35.2 C37.2 C38A.2 C38B.2 C38C.2 C38D.2 C39A.1 C39B.1 C39C.1 C39D.1 C40A.1 C40B.1 C40C.1 C40D.1 C41.1 C42.1 C43A.1 C43B.1 C43C.1 C43D.1 C45.1 C46.1 C48.1 C51A.1 C51B.1 C51C.1 C51D.1 C52A.1 C52B.1 C52C.1 C52D.1 C53A.1 C53B.1 C53C.1 C53D.1 C63.2 C64.1 C67.1 C69.1 C70.1 C73.1 C74.2 C75.1 C76.2 C77.1 C78.1 C79.2 C80.2 C82A.1 C82B.1 C82C.1 C82D.1 C83A.1 C83B.1 C83C.1 C83D.1 C84A.2 C84B.2 C84C.2 C84D.2 C85A.1 C85B.1 C85C.1 C85D.1 C86.1 C87A.1 C87B.1 C87C.1 C87D.1 C89.1 C90.1 C91.1 C94.1 C97.1 C98.1 C100.1 C101.1 C102.1 C104.1 C105A.1 C105B.1 C105C.1 C105D.1 C106A.1 C106B.1 C106C.1 C106D.1 C108A.1 C108B.1 C108C.1 C108D.1 C109A.1 C109B.1 C109C.1 C109D.1 C110A.1 C110B.1 C110C.1 C110D.1 C111A.1 C111B.1 C111C.1 C111D.1 C113.2 C114A.2 C114B.2 C114C.2 C114D.2 C115A.2 C115B.2 C115C.2 C115D.2 C116A.1 C116B.1 C116C.1 C116D.1 C117A.1 C117B.1 C117C.1 C117D.1 C118A.1 C118B.1 C118C.1 C118D.1 C119A.1 C119B.1 C119C.1 C119D.1 C120A.1 C120B.1 C120C.1 C120D.1 C121.2 C122.2 C123.1 C124A.1 C124B.1 C124C.1 C124D.1 C125A.1 C125B.1 C125C.1 C125D.1 C126A.1 C126B.1 C126C.1 C126D.1 C127A.1 C127B.1 C127C.1 C127D.1 C128A.1 C128B.1 C128C.1 C128D.1 C129A.1 C129B.1 C129C.1 C129D.1 C130A.1 C130B.1 C130C.1 C130D.1 C131.1 C132.1 C133A.1 C133B.1 C133C.1 C133D.1 C134A.1 C134B.1 C134C.1 C134D.1 C135A.1 C135B.1 C135C.1 C135D.1 C136A.1 C136B.1 C136C.1 C136D.1 C137A.1 C137B.1 C137C.1 C137D.1 C138A.1 C138B.1 C138C.1 C138D.1 C139.2 C140A.1 C140B.1 C140C.1 C140D.1 C141A.1 C141B.1 C141C.1 C141D.1 C142A.1 C142B.1 C142C.1 C142D.1 C143A.1 C143B.1 C143C.1 C143D.1 C144A.1 C144B.1 C144C.1 C144D.1 C145.1 C146A.1 C146B.1 C146C.1 C146D.1 C147A.1 C147B.1 C147C.1 C147D.1 C148A.1 C148B.1 C148C.1 C148D.1 C149A.1 C149B.1 C149C.1 C149D.1 C150A.1 C150B.1 C150C.1 C150D.1 C151A.1 C151B.1 C151C.1 C151D.1 C152.1 C153A.1 C153B.1 C153C.1 C153D.1 C154A.1 C154B.1 C154C.1 C154D.1 C155.1 C156.2 C157A.1 C157B.1 C157C.1 C157D.1 C158A.1 C158B.1 C158C.1 C158D.1 C159A.1 C159B.1 C159C.1 C159D.1 C160.2 C161.1 C162A.2 C162B.2 C162C.2 C162D.2 C163.1 C164A.2 C164B.2 C164C.2 C164D.2 C165.1 C166.1 C167.2 C168.1 C169.1 C171.1 C172A.2 C172B.2 C172C.2 C172D.2 C173.1 C174.2 C175.1 C176A.2 C176B.2 C176C.2 C176D.2 C177.1 C178.1 C179.1 C180A.2 C180B.2 C180C.2 C180D.2 C181.1 C182.1 C183.1 C184.1 C185.1 C186.1 C187.1 C188.1 C191.1 C192.1 C193.1 C195.2 C197.1 C198.1 C199.1 C200.1 C201.1 C202A.2 C202B.2 C202C.2 C202D.2 C203A.1 C203B.1 C203C.1 C203D.1 C204A.1 C204B.1 C204C.1 C204D.1 C205A.1 C205B.1 C205C.1 C205D.1 C206A.1 C206B.1 C206C.1 C206D.1 C207A.1 C207B.1 C207C.1 C207D.1 C208.1 C209.1 C210.1 C211.1 C212.2 C215.1 C216.1 C217.1 C218.1 CLIP1.1 CLIP2.1 CLIP3.1 CLIP4.1 CLIP5.1 CLIP6.1 CLIP7.1 CLIP8.1 CLIP9.1 CLIP10.1 CLIP11.1 CLIP12.1 CLIP13.1 CLIP14.1 CLIP15.1 CLIP16.1 CLIP17.1 CLIP18.1 CLIP19.1 CLIP20.1 CLIP21.1 CLIP22.1 CLIP23.1 CLIP24.1 CLIP25.1 CLIP26.1 CLIP27.1 CLIP28.1 CLIP29.1 CLIP30.1 CLIP31.1 D1A.1 D1B.1 D2A.1 D2B.1 D2C.1 D2D.1 FL2A.2 FL2A.4 FL2B.2 FL2B.4 FL2C.2 FL2C.4 FL2D.2 FL2D.4 IC1A.6 IC1A.7 IC1A.18 IC1A.23 IC1A.27 IC1A.31 IC1A.34 IC1A.38 IC1A.43 IC1A.49 IC1B.6 IC1B.7 IC1B.18 IC1B.23 IC1B.27 IC1B.31 IC1B.34 IC1B.38 IC1B.43 IC1B.49 IC2A.4 IC2A.5 IC2A.13 IC2A.16 IC2A.18 IC2A.22 IC2A.25 IC2A.26 IC2A.27 IC2A.29 IC2A.31 IC2A.32 IC2A.33 IC2A.34 IC2A.35 IC2A.36 IC2A.37 IC2A.38 IC2A.39 IC2A.41 IC2A.42 IC2A.43 IC2A.44 IC2A.46 IC2A.48 IC2A.49 IC2A.50 IC2A.51 IC2A.58 IC2A.65 IC2A.73 IC2A.78 IC2A.79 IC2A.82 IC2A.85 IC2A.88 IC2A.96 IC2A.101 IC2B.4 IC2B.5 IC2B.13 IC2B.16 IC2B.18 IC2B.22 IC2B.25 IC2B.26 IC2B.27 IC2B.29 IC2B.31 IC2B.32 IC2B.33 IC2B.34 IC2B.35 IC2B.36 IC2B.37 IC2B.38 IC2B.39 IC2B.41 IC2B.42 IC2B.43 IC2B.44 IC2B.46 IC2B.48 IC2B.49 IC2B.50 IC2B.51 IC2B.58 IC2B.65 IC2B.73 IC2B.78 IC2B.79 IC2B.82 IC2B.85 IC2B.88 IC2B.96 IC2B.101 IC2C.4 IC2C.5 IC2C.13 IC2C.16 IC2C.18 IC2C.22 IC2C.25 IC2C.26 IC2C.27 IC2C.29 IC2C.31 IC2C.32 IC2C.33 IC2C.34 IC2C.35 IC2C.36 IC2C.37 IC2C.38 IC2C.39 IC2C.41 IC2C.42 IC2C.43 IC2C.44 IC2C.46 IC2C.48 IC2C.49 IC2C.50 IC2C.51 IC2C.58 IC2C.65 IC2C.73 IC2C.78 IC2C.79 IC2C.82 IC2C.85 IC2C.88 IC2C.96 IC2C.101 IC2D.4 IC2D.5 IC2D.13 IC2D.16 IC2D.18 IC2D.22 IC2D.25 IC2D.26 IC2D.27 IC2D.29 IC2D.31 IC2D.32 IC2D.33 IC2D.34 IC2D.35 IC2D.36 IC2D.37 IC2D.38 IC2D.39 IC2D.41 IC2D.42 IC2D.43 IC2D.44 IC2D.46 IC2D.48 IC2D.49 IC2D.50 IC2D.51 IC2D.58 IC2D.65 IC2D.73 IC2D.78 IC2D.79 IC2D.82 IC2D.85 IC2D.88 IC2D.96 IC2D.101 IC3A.1 IC3A.3 IC3A.5 IC3A.12 IC3A.14 IC3A.16 IC3A.17 IC3A.18 IC3A.23 IC3A.25 IC3B.1 IC3B.3 IC3B.5 IC3B.12 IC3B.14 IC3B.16 IC3B.17 IC3B.18 IC3B.23 IC3B.25 IC3C.1 IC3C.3 IC3C.5 IC3C.12 IC3C.14 IC3C.16 IC3C.17 IC3C.18 IC3C.23 IC3C.25 IC3D.1 IC3D.3 IC3D.5 IC3D.12 IC3D.14 IC3D.16 IC3D.17 IC3D.18 IC3D.23 IC3D.25 IC4.2 IC4.4 IC5A.2 IC5A.4 IC5B.2 IC5B.4 IC5C.2 IC5C.4 IC5D.2 IC5D.4 IC6A.6 IC6A.7 IC6A.18 IC6A.23 IC6A.27 IC6A.31 IC6A.34 IC6A.38 IC6A.43 IC6A.49 IC6B.6 IC6B.7 IC6B.18 IC6B.23 IC6B.27 IC6B.31 IC6B.34 IC6B.38 IC6B.43 IC6B.49 IC7.12 IC7.21 IC8A.2 IC8B.2 IC9.2 IC9.3 IC9.6 IC9.12 IC9.22 IC9.23 IC9.33 IC10.F6 IC10.F11 IC10.G7 IC10.G8 IC10.G9 IC10.G10 IC10.H7 IC10.H8 IC10.H9 IC10.H10 IC10.J7 IC10.J8 IC10.J9 IC10.J10 IC10.K7 IC10.K8 IC10.K9 IC10.K10 IC10.L6 IC10.L11 IC11.12 IC11.21 IC12.4 IC13A.2 IC13A.4 IC13A.6 IC13A.8 IC13A.33 IC13A.39 IC13A.43 IC13A.52 IC13A.56 IC13A.57 IC13A.58 IC13A.65 IC13B.2 IC13B.4 IC13B.6 IC13B.8 IC13B.33 IC13B.39 IC13B.43 IC13B.52 IC13B.56 IC13B.57 IC13B.58 IC13B.65 IC13C.2 IC13C.4 IC13C.6 IC13C.8 IC13C.33 IC13C.39 IC13C.43 IC13C.52 IC13C.56 IC13C.57 IC13C.58 IC13C.65 IC13D.2 IC13D.4 IC13D.6 IC13D.8 IC13D.33 IC13D.39 IC13D.43 IC13D.52 IC13D.56 IC13D.57 IC13D.58 IC13D.65 IC14.2 IC15.B5 IC15.C1 IC15.C2 IC15.C5 IC15.D5 IC16.2 IC16.4 IC17A.3 IC17B.3 IC17C.3 IC17D.3 IC18.12 IC18.21 IC19.6 IC19.22 IC19.39 IC19.45 IC20.2 IC21.5 IC21.8 IC21.11 IC22.3 IC22.4 IC22.11 IC23A.10 IC23A.11 IC23A.17 IC23B.10 IC23B.11 IC23B.17 IC23C.10 IC23C.11 IC23C.17 IC23D.10 IC23D.11 IC23D.17 IC24.1 IC24.17 IC25.2 IC26A.4 IC26B.4 IC27.8 IC27.9 J1A.1 J1A.4 J1A.7 J1A.10 J1A.13 J1A.16 J1A.19 J1A.22 J1A.25 J1B.1 J1B.4 J1B.7 J1B.10 J1B.13 J1B.16 J1B.19 J1B.22 J1B.25 J7.2 J8.1 J8.3 J8.5 J8.7 J8.9 J8.11 J8.13 J10.1 J10.2 J10.7 J10.8 J10.13 J10.14 J10.19 J10.20 LD1.1 LD2.1 LD2.3 LD3.1 LD4.1 LD5.1 LD5.3 LD6.1 LD6.3 LD7.1 LD8.1 LD8.3 LD9.1 LD10.1 NT1.2 NT2.2 NT3.2 NT4.2 NT5.2 NT6.2 NT7.2 NT8.2 NT9.2 NT10.2 NT11.2 NT12.2 NT13.2 NT14.2 NT15.2 NT16.2 NT17.2 NT18.2 NT19.2 NT20.2 OSC1.2 OSC2.2 R3A.1 R3B.1 R3C.1 R3D.1 R4A.1 R4B.1 R4C.1 R4D.1 R6.1 R14.1 R15A.2 R15B.2 R15C.2 R15D.2 R18A.1 R18B.1 R18C.1 R18D.1 R19A.1 R19B.1 R19C.1 R19D.1 R20A.1 R20B.1 R20C.1 R20D.1 R34.1 R37.1 R38A.2 R38B.2 R38C.2 R38D.2 R39.1 R42.1 R45.1 R54A.2 R54B.2 R54C.2 R54D.2 R55.2 R57A.2 R57B.2 R57C.2 R57D.2 R58A.2 R58B.2 R58C.2 R58D.2 R60.1 R61.1 R62.1 R63.1 R64.1 R65.1 R69.1 R70.1 R71.1 R72.1 R74.1 R75.1 R76.1 R77.1 R80.1 R81.1 R82.2 R83.1 R85.1 R86.1 R87.2 R88A.1 R88B.1 R88C.1 R88D.1 R89A.2 R89B.2 R89C.2 R89D.2 R94A.1 R94B.1 R94C.1 R94D.1 R95.1 R101.1 R102.1 R104A.1 R104B.1 R104C.1 R104D.1 R105A.1 R105B.1 R105C.1 R105D.1 R106A.1 R106B.1 R106C.1 R106D.1 R107A.1 R107B.1 R107C.1 R107D.1 R108.2 R110.2 R111.1 R112A.2 R112B.2 R112C.2 R112D.2 R119.1 R126.1 R127.1 R128.1 R130.1 R132.1 R135.1 R136.1 R138A.1 R138B.1 R138C.1 R138D.1 R141.1 R149.1 R156.1 R157.1 R158.1 R159.1 R160.1 R161.1 R168.1 R172.1 R174.1 R176.1 R189.1 R190.2 R195.1 R197.1 TR1A.2 TR1A.3 TR1A.5 TR1B.2 TR1B.3 TR1B.5 TR1C.2 TR1C.3 TR1C.5 TR1D.2 TR1D.3 TR1D.5 TR2.1 TR2.2 TR2.5 TR3.1 TR3.2 TR3.5 TR4.1 TR5.1 TR6.1 TR7.1 TR8A.2 TR8A.4 TR8B.2 TR8B.4 TR8C.2 TR8C.4 TR8D.2 TR8D.4 | length 1651.1